# Altium PCB Input_Board.PcbDoc
Units mil, origin at the board's own origin, x right, y up, seen from the top; angles counter-clockwise.
Board outline 944.88 x 787.4 mil, 2 copper layers (Top Layer, Bottom Layer), stack 57 mil thick; 11 components, 8 nets, 44 pads, 451 vias.
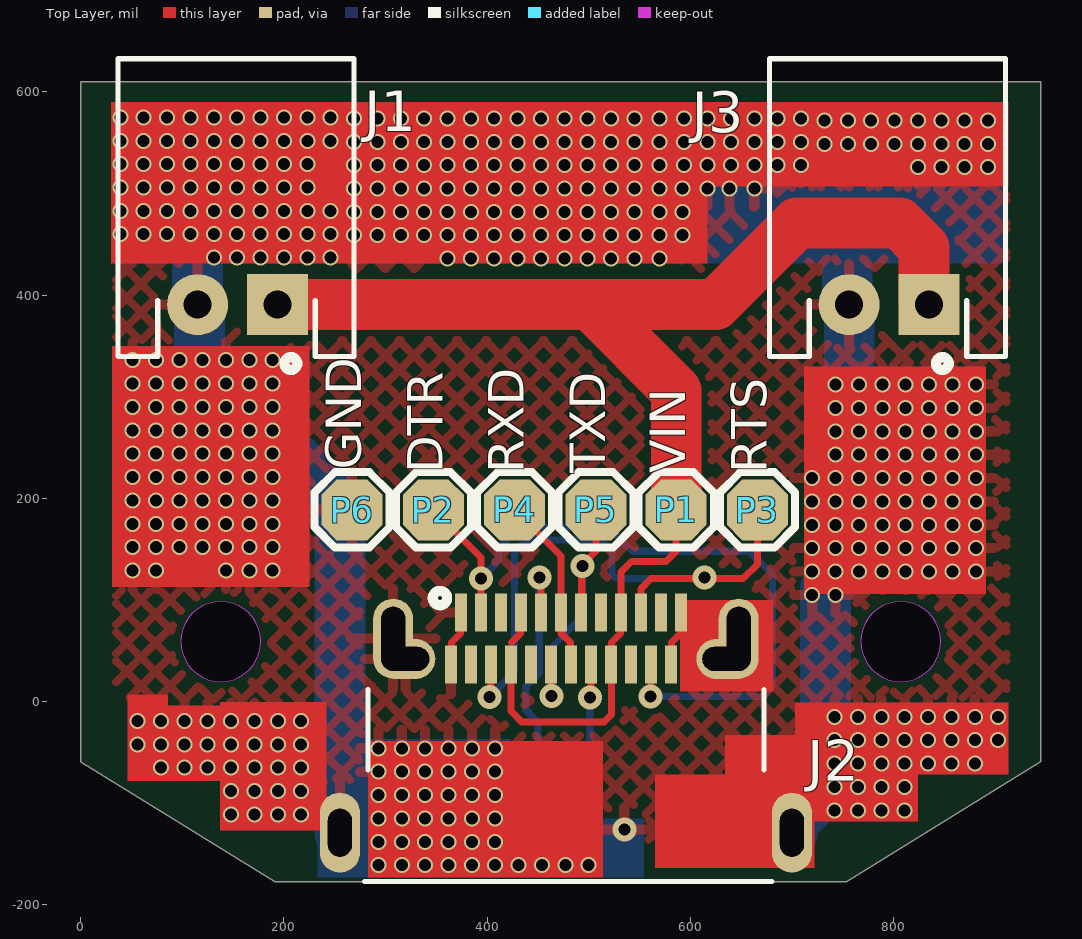
[diagram p0: Top Layer view]
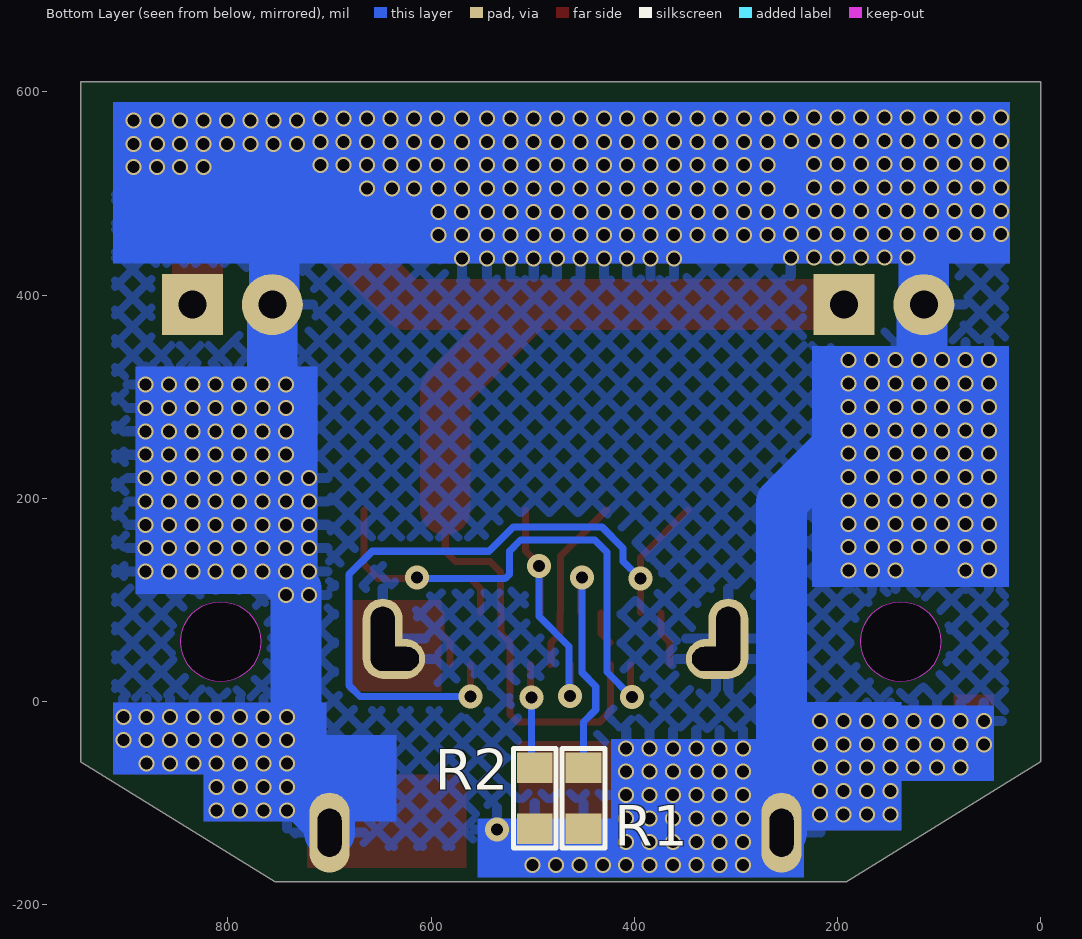
[diagram p1: Bottom Layer view, seen from below]
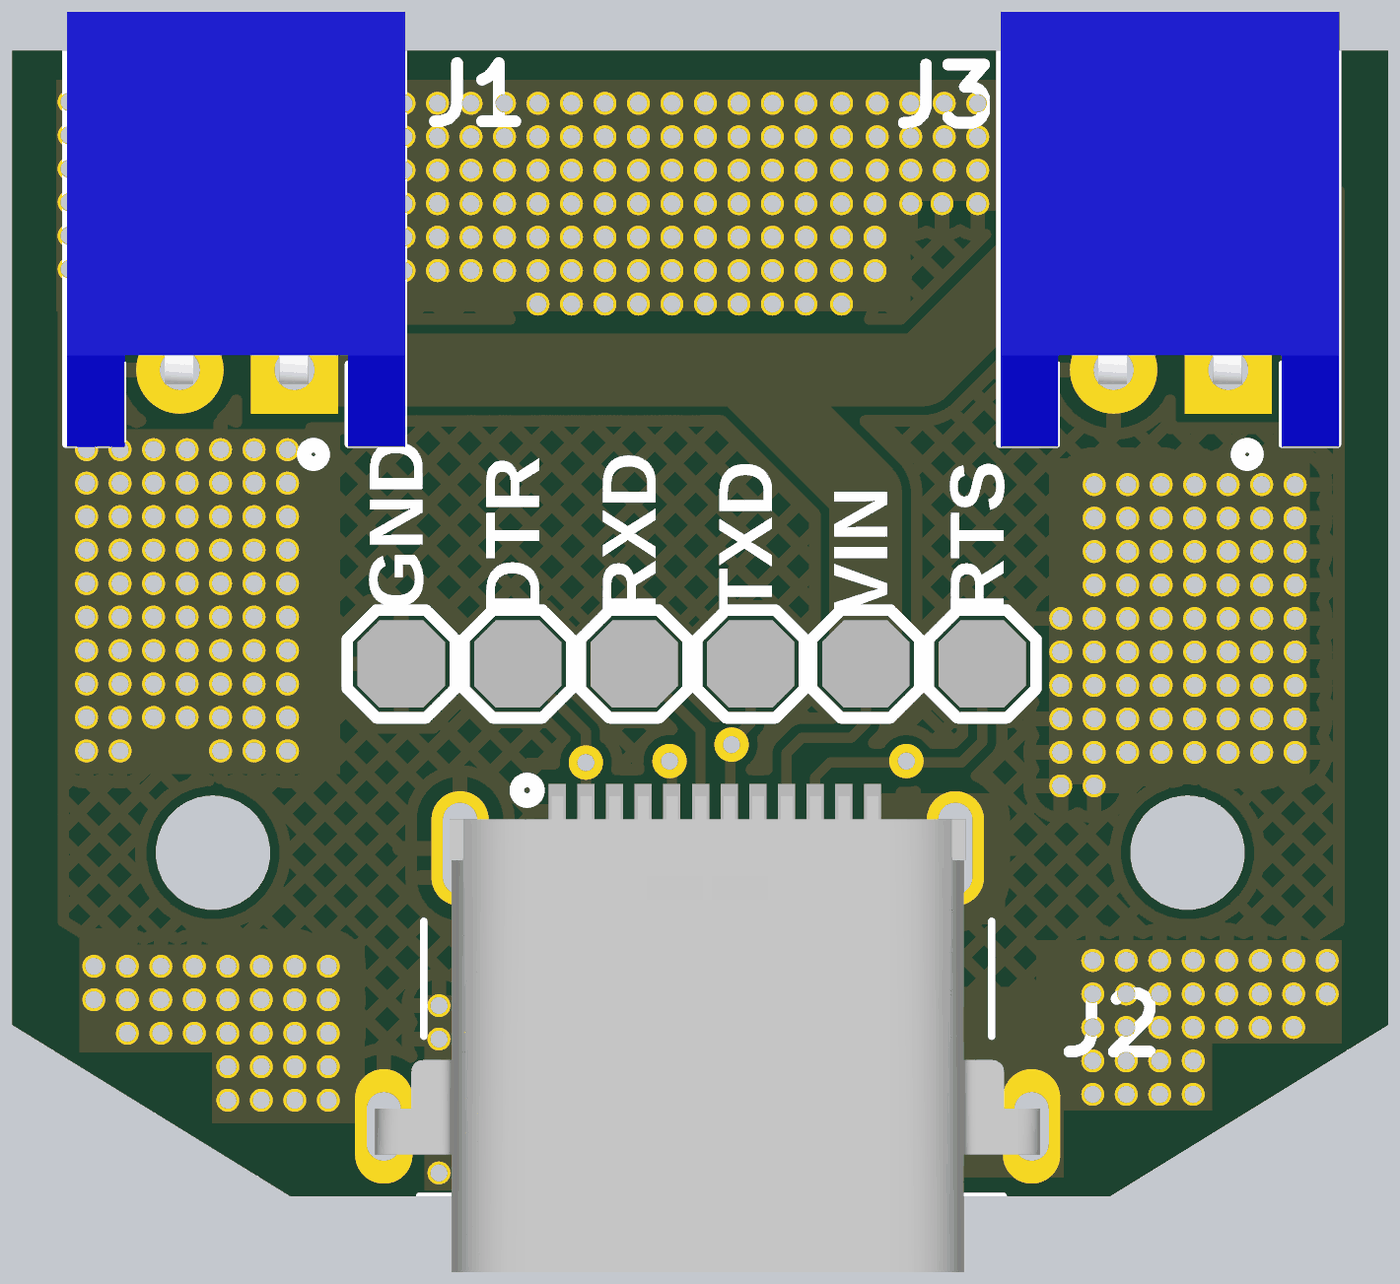
[diagram p2: 3D render of the assembled board from above, using the file's embedded part models]

## Layer stack, top to bottom
Top Solder: solder mask 3, Solder Resist, Dk 3.5
Top Layer: signal copper 10
Dielectric 1: dielectric 37, FR-4, Dk 4.8
Bottom Layer: signal copper 10
Bottom Solder: solder mask 3, Solder Resist, Dk 3.5

## Board outline
0,-59.2 191.37,-177.17 753.51,-177.17 944.88,-59.2 944.88,610.24 0,610.24
cut-out: 767.72,59.06 ccw(c807.09,59.06) 807.09,19.68 ccw(c807.09,59.06) 846.46,59.06 ccw(c807.09,59.06) 807.09,98.43 ccw(c807.09,59.06)
cut-out: 98.43,59.06 ccw(c137.8,59.06) 137.8,19.68 ccw(c137.8,59.06) 177.17,59.06 ccw(c137.8,59.06) 137.8,98.43 ccw(c137.8,59.06)

## Design rules (kind name [scope] priority, off if disabled: settings)
Clearance [All] p1: gap=6 ignorepadtopadclearanceinfootprint=FALSE
ComponentClearance [All] p1: gap=0 collisioncheckmode=3 verticalgap=0 showdistances=FALSE
HoleSize [All] p1: absolutevalues=TRUE maxlimit=1000 minlimit=1 maxpercent=80.000 minpercent=20.000
HoleToHoleClearance [All] p1: gap=0 allowstackedmicrovias=TRUE
MinimumSolderMaskSliver [All] p1: minsoldermaskwidth=0
PolygonConnect [All] p1: connectstyle=Relief reliefconductorwidth=10 reliefentries=4 polygonreliefangle="90 Angle" airgapwidth=10
RoutingVias [All] p1: holewidth=11.81 width=23.62 viastyle="Through Hole" minholewidth=7.87 minwidth=11.81 maxholewidth=11.81 maxwidth=31.5
SilkToSilkClearance [All] p1: silktosilkclearance=0
SilkToSolderMaskClearance [IsPad] p1: minsilkscreentomaskgap=0 clearancetoexposedcopper=TRUE
SolderMaskExpansion SolderMaskExpansion_1 [IsVia] p1: expansion=4 soldermaskfromhole=TRUE
SolderMaskExpansion [Not IsVia] p2: expansion=4
Width [All] p1: maxlimit=50 minlimit=7 preferedwidth=10
24 further rules are at their usual default settings.

## Components (designator, comment, footprint, x,y, rotation, side; value= is the part's Value field where it differs from the comment)
J1 "S2B-PH-K-S(LF)(SN)" S2B-PH-K-S(LF)(SN) 193.82,390.74 r180 top locked
J2 "U262-241N-4BVC16" U262-241N-4BVC16 477.56,61.94 r0 top locked value=Custom
J3 "S2B-PH-K-S(LF)(SN)" S2B-PH-K-S(LF)(SN) 835.08,390.74 r180 top locked
P1 "Test Point" "TEST POINT" 586.08,188.74 r0 top
P2 "Test Point" "TEST POINT" 347.08,188.74 r0 top
P3 "Test Point" "TEST POINT" 666.08,188.74 r0 top
P4 "Test Point" "TEST POINT" 427.08,188.74 r0 top
P5 "Test Point" "TEST POINT" 507.08,188.74 r0 top
P6 "Test Point" "TEST POINT" 267.08,188.74 r0 top
R1 "5.1K" Res0603 450,-95 r90 bottom
R2 "5.1K" Res0603 498,-95 r90 bottom

## Footprints (in the part's own frame and the unit in brackets; to place one, negate y for a bottom-side part, rotate by r counter-clockwise, add the part's x,y. Pads: shape width x height; smd on the part's side, far side on the other; paste and mask are expansions set on the pad)
Res0603 [mil]
  rect 30x35 smd: 1(-30,0) 2(30,0)
  silkscreen extent -49,-21 49,21, body extent -31,-17 31,17, height 18
S2B-PH-K-S(LF)(SN) [mil] "PH Header Male Pin 0.079\"(2.00mm) 2 Through Hole,P=2mm Wire To Board / Wire To Wire Connector RoHS"
  rect 60x60 hole 27.56: 1(0,0)
  round 60 hole 27.56: 2(78.74,0)
  silkscreen extent -75,-242 157,64, body extent -76,-246 156,53, height 189
"TEST POINT" [mil]
  oct 60x60 smd: 1(0,0)
  silkscreen extent -37,-37 37,37
U262-241N-4BVC16 [mm]
  rect 0.3x0.95 smd: A1(-2.625,0.65) A2(-2.125,0.65) A3(-1.625,0.65) A4(-1.125,0.65) A5(-0.625,0.65) A6(-0.125,0.65) A7(0.375,0.65) A8(0.875,0.65) A9(1.375,0.65) A10(1.875,0.65) A11(2.375,0.65) A12(2.875,0.65) B1(2.625,-0.65) B2(2.125,-0.65) B3(1.625,-0.65) B4(1.125,-0.65) B5(0.625,-0.65) B6(0.125,-0.65) B7(-0.375,-0.65) B8(-0.875,-0.65) B9(-1.375,-0.65) B10(-1.875,-0.65) B11(-2.375,-0.65) B12(-2.875,-0.65)
  oval 1x2 hole 0.6 slot 1.6 at 90 deg: S1(-4.32,0) S2(4.32,0)
  oval 1.5x1 hole 0.6 slot 1.2 at 0 deg: S1(-4.013,-0.508) S2(4.013,-0.508)
  oval 1x2 hole 0.6 slot 1.2 at 90 deg: S3(5.65,-4.85) S4(-5.65,-4.85)
  silkscreen extent -5.03,-6.07 5.16,1.2, body extent -5.8,-7.39 5.8,0.91, height 2.13

## Part data
J1 J3: "Conn Shrouded Header (4 Sides) HDR 2 POS 2mm Solder RA Thru-Hole Box", Color=Natural,White, Contact Resistance=20mR, Current Rating=2A, Flammability Rating="UL94 V-0", Housing Color=White, Insulation Resistance=1GR, Manufacturer=JST, Max Operating Temperature=85°C, Max Voltage Rating (AC)=100V, Min Operating Temperature=-25°C, Supplier Part Number 1=7754757, Category="Headers and Wire Housings", ComponentLink1Description=https://datasheet.ciiva.com/11747/0900766b8082f558-11747128.pdf?src-supplier=RSComponents, ComponentLink1URL=https://datasheet.ciiva.com/11747/0900766b8082f558-11747128.pdf?src-supplier=RSComponents, ComponentLink2Description=https://datasheet.ciiva.com/712/eph-712447.pdf?src-supplier=Digi-Key, ComponentLink2URL=https://datasheet.ciiva.com/712/eph-712447.pdf?src-supplier=Digi-Key, ComponentLink3Description=https://datasheet.ciiva.com/8052/80564-8052207.pdf?src-supplier=Element14, ComponentLink3URL=https://datasheet.ciiva.com/8052/80564-8052207.pdf?src-supplier=Element14, ComponentLink4Description=https://datasheet.ciiva.com/16484/s2b-ph-k-slfsn-16484405.pdf?src-supplier=Future+Electronics, ComponentLink4URL=https://datasheet.ciiva.com/16484/s2b-ph-k-slfsn-16484405.pdf?src-supplier=Future+Electronics, ComponentLink5Description=https://datasheet.ciiva.com/26894/getdatasheetpartid-641020-26894599.pdf?src-supplier=Verical, ComponentLink5URL=https://datasheet.ciiva.com/26894/getdatasheetpartid-641020-26894599.pdf?src-supplier=Verical, Connector Type="Male Pin", Contact Material=Tin,Brass,Bronze, Contact Mating Length=0.13inch, Contact Plating=Tin,Copper, Contact Type="Male Pin", Depth=7.6mm, Fastening Type=Detent, Gender=Male, Height=9.4mm, Housing Material=Polyamide, Lead Free="Lead Free", Lead Pitch=2mm, Length=5.9mm, Manufacturer Part Number=S2B-PH-K-S(LF)(SN), Max Current Rating=2A, Max Voltage Rating (DC)=100V, Mount="Through Hole", Number of Contacts=2, Number of Pins=2, Number of Poles=2, Number of Positions=2, Number of Rows=1, Orientation="Right Angle", Packaging=Bulk, Pitch=2mm, Pricing 1="1=0.07140, 500=0.06210, 2000=0.06020, 5000=0.05890, 20000=0.05710 (USD)", REACH SVHC="No SVHC", RoHS=Yes, Series=PH, Stock 1=156269, Supplier 1="Future Electronics", Termination=Solder, Voltage Rating=100V, Voltage Rating (AC)=100V, Width=4.5mm, Working Voltage=100V
J2: "Receptacle USB - Type C 24 - Sinking board USB Connectors ROHS", Manufacturer="XKB Connectivity", Package=Custom, ComponentLink1Description=LCSC, ComponentLink1URL=https://lcsc.com/product-detail/USB-Connectors_XKB-Connectivity-U262-241N-4BVC16_C388661.html, Manufacturer Part No=U262-241N-4BVC16
P1 P2 P3 P4 P5 P6: library part "TEST POINT", "Test Point ON"
R1 R2: library part RMCF0603FT5K10, "RES 5.1K OHM 1% 1/10W 0603", Case Code (Imperial)=0603, Case Code (Metric)=1608, Manufacturer="Stackpole Electronics", Max Operating Temperature=155°C, Max Power Dissipation=100mW, Min Operating Temperature=-55°C, Resistance=5.1kR, Resistor Type="Thick Film", Supplier Part Number 1=RMCF0603FT5K10DKR-ND, Temperature Coefficient=100ppm/°C, Tolerance=1%, Case/Package=0603, ComponentLink1Description=https://www.seielect.com/catalog/SEI-RMCF_RMCP.pdf?src-supplier=Avnet, ComponentLink1URL=https://www.seielect.com/catalog/SEI-RMCF_RMCP.pdf?src-supplier=Avnet, ComponentLink2Description=http://components.arrow.com/part/dataview/50863347S9465827N1174?src-supplier=Arrow+Electronics, ComponentLink2URL=http://components.arrow.com/part/dataview/50863347S9465827N1174?src-supplier=Arrow+Electronics, ComponentLink3Description=https://www.seielect.com/catalog/SEI-Packaging.pdf?src-supplier=Digi-Key, ComponentLink3URL=https://www.seielect.com/catalog/SEI-Packaging.pdf?src-supplier=Digi-Key, Contact Plating=Tin,Matte, Features="Automotive AEC-Q200", Height=0.022inch, Length=0.061inch, Manufacturer Part Number=RMCF0603FT5K10, Mount="Surface Mount", Number of Terminations=2, Packaging="Tape and Reel", Pricing 1="1=0.1, 10=0.017, 100=0.0068, 1000=0.00305, 2500=0.00264 (USD)", Radiation Hardening=No, RoHS Compliant=Yes, Series=RMCF, Stock 1=58341, Supplier 1=Digi-Key, Width=0.031inch

## Via types
v1: diameter 15.75, hole 11.81, Top Layer to Bottom Layer, 442 vias
v2: diameter 23.62, hole 11.81, Top Layer to Bottom Layer, 9 vias

## Nets (pads, with @x,y where several pads share a name; then routed paths per layer and width w, separated by ;. In a path a pad name is that pad's centre, name@x,y a point inside that pad or via, vN(x,y) a via of type N, cw(c..) or ccw(c..) an arc to the next point about the centre after c; other vN are vias at no path point)
DTR: J2.A2 J2.B2 P2.1 | length 720.9
  Top Layer w7: P2.1 393.9,141.92 v2(393.9,121) J2.A2 ; v2(561,5) 561.22,5.22 J2.B2
  Bottom Layer w7: v2(393.9,121) 411,138.1 411,151 432,172 519,172 543,148 658,148 681,125 681,16 670,5 v2(561,5)
GND: J1.2 J2.A1 J2.A12 J2.B1 J2.B12 J2.S1 J2.S2 J2.S3 J2.S4 J3.2 P6.1 R1.1 R2.1 | length 2163.8
  Top Layer w7: J2.B12@364.85,36.83 364.85,58 373.85,67 J2.A1@373.85,87.17 ; J2.B1@581.39,36.83 581.39,58 590.39,67 J2.A12@590.39,87.17
  Bottom Layer w10: R1.1 R2.1 534,-125 v2(535,-126)
  Bottom Layer w50: J2.S4 255.12,195.88 116.99,334.01 116.99,388.83 J1.2 115.08,487.71 144.37,517 710,517 754.43,472.57 754.43,392.65 J3.2 756.34,134.34 733,111 733,-86.94 700,-119.94 J2.S3
  other v1: 293,-161 316,-161 339,-161 362,-161 385,-161 408,-161 431,-161 454,-161 477,-161 500,-161 293,-138 316,-138 339,-138 362,-138 385,-138 408,-138 293,-115 316,-115 339,-115 362,-115 385,-115 408,-115 148,-111 171,-111 194,-111 217,-111 742,-107 765,-107 788,-107 811,-107 293,-92 316,-92 339,-92 362,-92 385,-92 408,-92 148,-88 171,-88 194,-88 217,-88 742,-84 765,-84 788,-84 811,-84 293,-69 316,-69 339,-69 362,-69 385,-69 408,-69 79,-65 102,-65 125,-65 148,-65 171,-65 194,-65 217,-65 742,-61 765,-61 788,-61 811,-61 834,-61 857,-61 880,-61 293,-46 316,-46 339,-46 362,-46 385,-46 408,-46 56,-42 79,-42 102,-42 125,-42 148,-42 171,-42 194,-42 217,-42 742,-38 765,-38 788,-38 811,-38 834,-38 857,-38 880,-38 903,-38 56,-19 79,-19 102,-19 125,-19 148,-19 171,-19 194,-19 217,-19 742,-15 765,-15 788,-15 811,-15 834,-15 857,-15 880,-15 903,-15 720,105 743,105 720,128 743,128 766,128 789,128 812,128 835,128 858,128 881,128 51,129 74,129 143,129 166,129 189,129 720,151 743,151 766,151 789,151 812,151 835,151 858,151 881,151 51,152 74,152 97,152 120,152 143,152 166,152 189,152 720,174 743,174 766,174 789,174 812,174 835,174 858,174 881,174 51,175 74,175 97,175 120,175 143,175 166,175 189,175 720,197 743,197 766,197 789,197 812,197 835,197 858,197 881,197 51,198 74,198 97,198 120,198 143,198 166,198 189,198 720,220 743,220 766,220 789,220 812,220 835,220 858,220 881,220 51,221 74,221 97,221 120,221 143,221 166,221 189,221 743,243 766,243 789,243 812,243 835,243 858,243 881,243 51,244 74,244 97,244 120,244 143,244 166,244 189,244 743,266 766,266 789,266 812,266 835,266 858,266 881,266 51,267 74,267 97,267 120,267 143,267 166,267 189,267 743,289 766,289 789,289 812,289 835,289 858,289 881,289 51,290 74,290 97,290 120,290 143,290 166,290 189,290 743,312 766,312 789,312 812,312 835,312 858,312 881,312 51,313 74,313 97,313 120,313 143,313 166,313 189,313 51,336 74,336 97,336 120,336 143,336 166,336 189,336 361,436 384,436 407,436 430,436 453,436 476,436 499,436 522,436 545,436 569.5,436 131,437 154,437 177,437 200,437 223,437 246,437 269,459 292,459 315,459 338,459 361,459 384,459 407,459 430,459 453,459 476,459 499,459 522,459 545,459 569.5,459 592.5,459 39,460 62,460 85,460 108,460 131,460 154,460 177,460 200,460 223,460 246,460 269,482 292,482 315,482 338,482 361,482 384,482 407,482 430,482 453,482 476,482 499,482 522,482 545,482 569.5,482 592.5,482 39,483 62,483 85,483 108,483 131,483 154,483 177,483 200,483 223,483 246,483 269,505 292,505 315,505 338,505 361,505 384,505 407,505 430,505 453,505 476,505 499,505 522,505 545,505 569.5,505 592.5,505 617,505 638.5,505 663,505 39,506 62,506 85,506 108,506 131,506 154,506 177,506 200,506 223,506 824,526 847,526 870,526 893,526 269,528 292,528 315,528 338,528 361,528 384,528 407,528 430,528 453,528 476,528 499,528 522,528 545,528 569.5,528 594,528 617,528 640,528 663,528 686,528 709,528 39,529 62,529 85,529 108,529 131,529 154,529 177,529 200,529 223,529 732,549 755,549 778,549 801,549 824,549 847,549 870,549 893,549 269,551 292,551 315,551 338,551 361,551 384,551 407,551 430,551 453,551 476,551 499,551 522,551 545,551 569.5,551 594,551 617,551 640,551 663,551 686,551 709,551 39,552 62,552 85,552 108,552 131,552 154,552 177,552 200,552 223,552 246,552 732,572 755,572 778,572 801,572 824,572 847,572 870,572 893,572 269,574 292,574 315,574 338,574 361,574 384,574 407,574 430,574 453,574 476,574 499,574 522,574 545,574 569.5,574 594,574 617,574 640,574 663,574 686,574 709,574 39,575 62,575 85,575 108,575 131,575 154,575 177,575 200,575 223,575 246,575
NetJ2_A5: J2.A5 R1.2 | length 232.6
  Top Layer w7: v2(451.33,122) 452.95,120.37 J2.A5
  Bottom Layer w7: R1.2 450,-20 438,-8 438,15 451.33,28.33 v2(451.33,122)
NetJ2_B5: J2.B5 R2.2 | length 103.1
  Top Layer w7: v2(501.02,4) 502.17,5.15 J2.B5
  Bottom Layer w7: R2.2 501.02,-61.98 v2(501.02,4)
RTS: J2.A10 J2.B10 P3.1 | length 608.7
  Top Layer w7: v2(402.11,4.63) 403.74,6.26 J2.B10 ; J2.A10 551.38,111 561.38,121 652,121 666.08,135.08 P3.1
  Bottom Layer w7: v2(402.11,4.63) 402.48,5 403,5 427,29 427,147 439,159 512,159 523,148 523,125.1 527.1,121 613,121 v2(614,122)
RXD: J2.A6 J2.B6 P4.1 | length 175.3
  Top Layer w7: P4.1 472.64,143.18 J2.A6 473,87.17 473,67 482,58 482,36.83 J2.B6
TXD: J2.A7 J2.B7 P5.1 | length 279.1
  Top Layer w7: J2.B7@463,36.15 J2.B7 462.8,7.2 463.51,6.49 v2(463.51,5.55) ; J2.A7 493.14,88.35 493.14,132.51 v2(493.95,133.32) 493.95,135.11 507.08,148.24 P5.1
  Bottom Layer w7: v2(463.51,5.55) 464.33,6.36 464.33,54.33 493.95,83.95 v2(493.95,133.32)
VIN: J1.1 J2.A4 J2.A9 J2.B4 J2.B9 J3.1 P1.1 | length 1407
  Top Layer w7: J2.B9 423.43,-9.43 434,-20 515,-20 522.33,-12.67 522.33,58 531.33,67 J2.A9@531.33,87.17 ; 423.91,58 432.91,67 J2.A4@432.91,87.17 ; J2.A9 531.69,127.69 542,138 576,138 586.08,148.08 P1.1
  Top Layer w50: J1.1 501.26,390.74 ; P1.1 586.08,305.92 501.26,390.74 ; J3.1 830.08,395.74 830.08,446.71 805.79,471 705,471 624.74,390.74 501.26,390.74
pads on no net: J2.A3 J2.A8 J2.A11 J2.B3 J2.B8 J2.B11

## Polygon pours and split planes (outlines as drawn)
GND on Top Layer "GND_L01_P000" (hatched 45Degree grid 20 track 8, pour order 0): 35,12.07 281.69,-140 664.47,-140 911,11.97 911,566 35,566
GND on Bottom Layer "GND_L02_P001" (hatched 45Degree grid 20 track 8, remove dead copper, pour order 1): 35,-18.34 237.22,-143 715.29,-143 911,-22.36 911,574 35,574

## Other copper
Top Layer:
  rectangle net GND: 590,10 682,100
  rectangle net GND: 46,-53 86,7
  rectangle net GND: 46,-78 157,-4
  rectangle net GND: 137,-127 242,-0.39
  rectangle net GND: 712,106 891,330
  rectangle net GND: 565,507 913,590
  rectangle net GND: 30,431 617,590
  rectangle net GND: 31,113 225,350
  rectangle net GND: 283,-173 514,-39
  rectangle net GND: 565,-164 722,-72
  rectangle net GND: 634,-118 824,-33
  rectangle net GND: 703,-72 913,-49
  rectangle net GND: 703,-56 913,-1
Bottom Layer:
  rectangle net GND: 30,431 913,590
  rectangle net GND: 712,106 891,330
  rectangle net GND: 31,113 225,350
  rectangle net GND: 703,-56 913,-1
  rectangle net GND: 703,-72 913,-49
  rectangle net GND: 634,-118 824,-33
  rectangle net GND: 137,-127 242,-0.39
  rectangle net GND: 46,-78 157,-4
  rectangle net GND: 233,-173 554.42,-115
  rectangle net GND: 233,-147 423,-37

## Silkscreen, mask and mechanical layers (free items; w line width, h text height)
Top Overlay:
  text "GND" at 288,228 h60 r90
  text "DTR" at 368,224.61 h60 r90
  text "RXD" at 448,224.61 h60 r90
  text "TXD" at 528,224.61 h60 r90
  text "VIN" at 607,224.61 h60 r90
  text "RTS" at 687,224.61 h60 r90
Mechanical 2:
  circle w3.94: c807.09,59.06 r39.37
  circle w3.94: c137.8,59.06 r39.37
  lines w3.94: 0,-59.2 0,610.24 944.88,610.24 944.88,-59.2 753.51,-177.17 191.37,-177.17 0,-59.2

## Dimensions
191.37,-177.17 to 753.51,-177.17 on Mechanical 2
944.88,-59.2 to 753.51,-177.17 on Mechanical 2
0,-59.2 to 191.37,-177.17 on Mechanical 2
0,610.24 to 0,-59.2 on Mechanical 2
0,610.24 to 944.88,610.24 on Mechanical 2